# Altium PCB S56_MLD_tiny.pcbdoc (part 3 of 3)
Units mm, origin at the board's own origin, x right, y up, seen from the top; angles counter-clockwise.
Board outline 37.7 x 36.5 mm, 4 copper layers (Top Layer, Layer 1, Layer 3, Bottom Layer), stack 1.748 mm thick; 192 components, 89 nets, 791 pads, 423 vias.
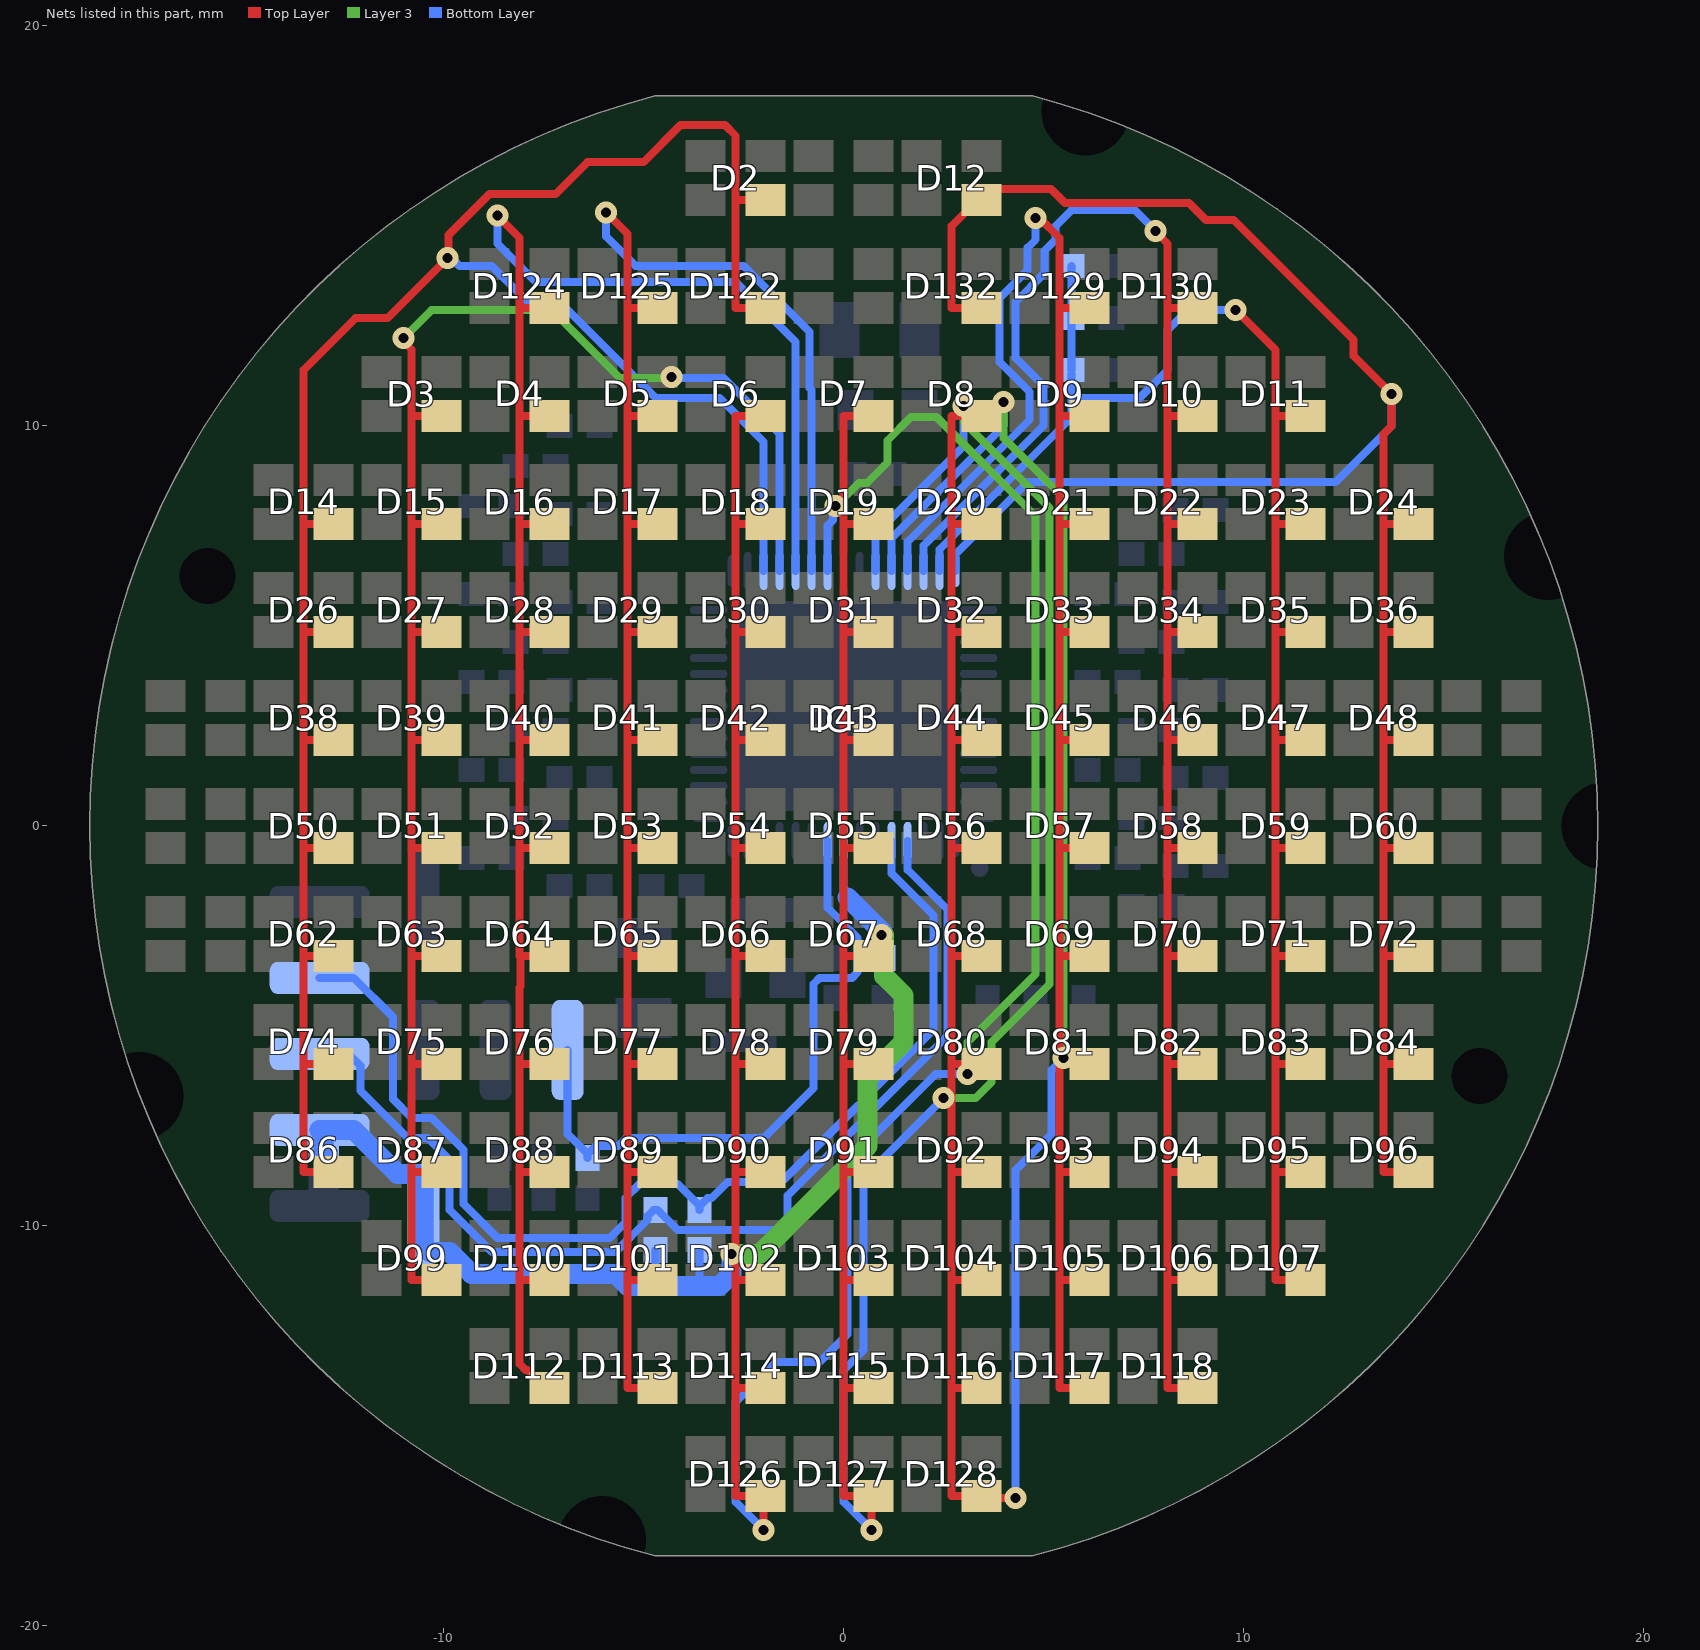
[diagram p5: the nets of this part, all layers, seen from the top]

## Via types
v1: diameter 0.55, hole 0.25, Top Layer to Layer 1, tented both sides, 200 vias
v2: diameter 0.55, hole 0.25, Top Layer to Bottom Layer, tented both sides, 178 vias
v3: diameter 0.55, hole 0.25, Layer 3 to Bottom Layer, tented both sides, 44 vias
v4: diameter 0.55/0.55/0.55/0.55 (per signal layer), hole 0.25, Top Layer to Bottom Layer, tented both sides, 1 vias

## Nets (pads, with @x,y where several pads share a name; then routed paths per layer and width w, separated by ;. In a path a pad name is that pad's centre, name@x,y a point inside that pad or via, vN(x,y) a via of type N, cw(c..) or ccw(c..) an arc to the next point about the centre after c; other vN are vias at no path point) (continued)
R2: D2.1 D14.1 D26.1 D38.1 D50.1 D62.1 D74.1 D86.1 D122.1 IC1.33 | length 57.9
  Top Layer w0.2: -13.5,-5.95 D74.1@-12.75,-5.95 ; -13.5,-3.25 D62.1@-12.75,-3.25 ; -13.5,-0.55 D50.1@-12.75,-0.55 ; -13.5,4.85 D26.1@-12.75,4.85 ; -13.5,7.55 D14.1@-12.75,7.55 ; D86.1@-12.75,-8.65 -13.5,-8.65 -13.5,2.15 ; D38.1@-12.75,2.15 -13.5,2.15 ; v2(-9.9,14.2) -11.4,12.7 -12.2,12.7 -13.5,11.4 -13.5,2.15 ; v2@-9.88,14.22 -9.88,14.775 -8.855,15.8 -7.2,15.8 -6.4,16.6 -5,16.6 -4.077,17.523 -2.97,17.523 -2.7,17.254 -2.7,16.246 -2.7,12.95 D122.1@-1.95,12.95 ; -2.7,15.65 D2.1@-1.95,15.65
  Bottom Layer w0.2: v2(-9.9,14.2) -9.808,14.2 -9.608,14 -8.8,14 -7.9,13.1 -7.1,13.1 -4.7,10.7 -3.1,10.7 -2,9.6 IC1.33@-2,6.375
R3: D3.1 D15.1 D27.1 D39.1 D51.1 D63.1 D75.1 D87.1 D99.1 IC1.34 | length 44.8
  Top Layer w0.2: v2(-11,12.2) -11,12.105 -10.8,11.905 -10.8,10.846 -10.8,-11.35 D99.1@-10.05,-11.35 ; -10.8,-8.65 D87.1@-10.05,-8.65 ; -10.8,-5.95 D75.1@-10.05,-5.95 ; -10.8,-3.25 D63.1@-10.05,-3.25 ; -10.8,-0.55 D51.1@-10.05,-0.55 ; -10.8,2.15 D39.1@-10.05,2.15 ; -10.8,4.85 D27.1@-10.05,4.85 ; -10.8,7.55 D15.1@-10.05,7.55 ; -10.8,10.25 D3.1@-10.05,10.25
  Layer 3 w0.2: v2(-11,12.2) -10.3,12.9 -7.3,12.9 -5.6,11.2 -4.325,11.2 v3(-4.3,11.225)
  Bottom Layer w0.2: v3(-4.3,11.225) -4.275,11.2 -3,11.2 -1.6,9.8 IC1.34@-1.6,6.375
R4: D4.1 D16.1 D28.1 D40.1 D52.1 D64.1 D76.1 D88.1 D100.1 D112.1 D124.1 IC1.35 | length 52.4
  Top Layer w0.2: v2(-8.656,15.256) -8.1,14.7 -8.1,13.546 -8.1,10.25 ; -8.1,-11.35 D100.1@-7.35,-11.35 ; -8.1,-8.65 D88.1@-7.35,-8.65 ; -8.1,-5.95 D76.1@-7.35,-5.95 ; -8.1,-0.55 D52.1@-7.35,-0.55 ; -8.1,2.15 D40.1@-7.35,2.15 ; -8.1,4.85 D28.1@-7.35,4.85 ; -8.1,7.55 D16.1@-7.35,7.55 ; -8.1,12.95 D124.1@-7.35,12.95 ; D112.1@-7.35,-14.05 -7.45,-14.05 -7.9,-13.6 -7.954,-13.6 -8.1,-13.454 -8.1,-4.042 -8.075,-4.017 -8.075,-3.275 -8.1,-3.25 ; D64.1@-7.35,-3.25 -8.1,-3.25 ; D4.1@-7.35,10.25 -8.1,10.25 ; -8.1,-3.25 -8.1,10.25
  Bottom Layer w0.2: v2(-8.656,15.256) -8.656,14.556 -7.7,13.6 -2.7,13.6 -1.2,12.1 IC1.35@-1.2,6.375
R5: D5.1 D17.1 D29.1 D41.1 D53.1 D65.1 D77.1 D89.1 D101.1 D113.1 D125.1 IC1.36 | length 50.5
  Top Layer w0.2: v2(-5.942,15.342) -5.4,14.8 -5.4,12.95 ; -5.4,-11.35 D101.1@-4.65,-11.35 ; -5.4,-8.65 D89.1@-4.65,-8.65 ; -5.4,-5.95 D77.1@-4.65,-5.95 ; -5.4,-3.25 D65.1@-4.65,-3.25 ; -5.4,-0.55 D53.1@-4.65,-0.55 ; -5.4,2.15 D41.1@-4.65,2.15 ; -5.4,4.85 D29.1@-4.65,4.85 ; -5.4,7.55 D17.1@-4.65,7.55 ; D113.1@-4.65,-14.05 -5.4,-14.05 -5.4,10.25 ; D5.1@-4.65,10.25 -5.4,10.25 ; D125.1@-4.65,12.95 -5.4,12.95 ; -5.4,10.25 -5.4,12.95
  Bottom Layer w0.2: v2(-5.942,15.342) -5.942,14.742 -5.2,14 -2.5,14 -0.85,12.35 -0.85,10.95 -0.8,10.9 IC1.36@-0.8,6.375
R6: D6.1 D18.1 D30.1 D42.1 D54.1 D66.1 D78.1 D90.1 D102.1 D114.1 D126.1 IC1.37 | length 75
  Top Layer w0.2: -2.7,-14.05 D114.1@-1.95,-14.05 ; -2.7,-11.35 D102.1@-1.95,-11.35 ; -2.7,-8.65 D90.1@-1.95,-8.65 ; -2.7,-5.95 D78.1@-1.95,-5.95 ; -2.7,-3.25 D66.1@-1.95,-3.25 ; -2.7,-0.55 D54.1@-1.95,-0.55 ; -2.7,2.15 D42.1@-1.95,2.15 ; -2.7,4.85 D30.1@-1.95,4.85 ; -2.7,7.55 D18.1@-1.95,7.55 ; v2(-2,-17.6) -2,-16.8 D126.1@-1.95,-16.75 -2.7,-16.75 -2.7,10.25 D6.1@-1.95,10.25
  Layer 3 w0.2: v3(-0.2,8) 0.38,8.58 0.587,8.58 1.1,9.093 1.1,9.642 1.683,10.225 2.317,10.225 4.8,7.742 4.8,-3.7 3.1,-5.4 v3(3.1,-6.2)
  Bottom Layer w0.2: v2(-2,-17.6) -2.7,-16.9 -2.7,-14.4 -1.7,-13.4 -0.6,-13.4 0.1,-12.7 0.1,-8.4 2.3,-6.2 v3(3.1,-6.2) ; IC1.37@-0.4,6.375 -0.4,7.51 -0.267,7.643 -0.267,7.933 v3(-0.2,8)
R7: D7.1 D19.1 D31.1 D43.1 D55.1 D67.1 D79.1 D91.1 D103.1 D115.1 D127.1 IC1.40 | length 73
  Top Layer w0.2: 0,-14.05 D115.1@0.75,-14.05 ; 0,-11.35 D103.1@0.75,-11.35 ; 0,-8.65 D91.1@0.75,-8.65 ; 0,-5.95 D79.1@0.75,-5.95 ; 0,-3.25 D67.1@0.75,-3.25 ; 0,-0.55 D55.1@0.75,-0.55 ; 0,2.15 D43.1@0.75,2.15 ; 0,4.85 D31.1@0.75,4.85 ; 0,7.55 D19.1@0.75,7.55 ; v2(0.7,-17.6) 0.7,-16.8 D127.1@0.75,-16.75 0,-16.75 0,10.25 D7.1@0.75,10.25
  Layer 3 w0.2: v3(2.5,-6.8) 3.3,-6.8 3.7,-6.4 3.7,-5.4 5.15,-3.95 5.15,7.95 3.007,10.093 3.007,10.493 v3(3,10.5)
  Bottom Layer w0.2: v2(0.7,-17.6) 0,-16.9 0,-13.6 0.5,-13.1 0.5,-8.8 v3(2.5,-6.8) ; IC1.40@0.8,6.375 0.8,7.296 3,9.496 v3(3,10.5)
R8: D8.1 D20.1 D32.1 D44.1 D56.1 D68.1 D80.1 D92.1 D104.1 D116.1 D128.1 IC1.41 | length 70
  Top Layer w0.2: 2.7,-14.05 D116.1@3.45,-14.05 ; 2.7,-11.35 D104.1@3.45,-11.35 ; 2.7,-8.65 D92.1@3.45,-8.65 ; 2.7,-5.95 D80.1@3.45,-5.95 ; 2.7,-3.25 D68.1@3.45,-3.25 ; 2.7,-0.55 D56.1@3.45,-0.55 ; 2.7,2.15 D44.1@3.45,2.15 ; 2.7,4.85 D32.1@3.45,4.85 ; 2.7,7.55 D20.1@3.45,7.55 ; D8.1@3.45,10.25 2.7,10.25 2.7,-16.75 D128.1@3.45,-16.75 3.5,-16.8 v2(4.3,-16.8)
  Layer 3 w0.2: v3(4,10.6) 4,9.7 5.5,8.2 v3(5.5,-5.8)
  Bottom Layer w0.2: IC1.41@1.2,6.375 1.2,7.201 4,10.001 v3(4,10.6) ; v2(4.3,-16.8) 4.3,-8.6 5.2,-7.7 5.2,-6.1 v3(5.5,-5.8)
R9: D9.1 D21.1 D33.1 D45.1 D57.1 D69.1 D81.1 D93.1 D105.1 D117.1 D129.1 IC1.42 | length 48.6
  Top Layer w0.2: v2(4.8,15.2) 4.895,15.2 5.4,14.695 5.4,12.95 ; 5.4,-11.35 D105.1@6.15,-11.35 ; 5.4,-8.65 D93.1@6.15,-8.65 ; 5.4,-5.95 D81.1@6.15,-5.95 ; 5.4,-3.25 D69.1@6.15,-3.25 ; 5.4,-0.55 D57.1@6.15,-0.55 ; 5.4,2.15 D45.1@6.15,2.15 ; 5.4,4.85 D33.1@6.15,4.85 ; 5.4,7.55 D21.1@6.15,7.55 ; D117.1@6.15,-14.05 5.4,-14.05 5.4,10.25 ; D9.1@6.15,10.25 5.4,10.25 ; D129.1@6.15,12.95 5.4,12.95 ; 5.4,10.25 5.4,12.95
  Bottom Layer w0.2: IC1.42@1.6,6.375 1.6,7.107 4.65,10.157 4.65,10.85 3.9,11.6 3.9,13.2 4.6,13.9 4.6,14.458 4.8,14.658 v2(4.8,15.2)
R10: D10.1 D22.1 D34.1 D46.1 D58.1 D70.1 D82.1 D94.1 D106.1 D118.1 D130.1 IC1.43 | length 50.8
  Top Layer w0.2: v2(7.8,14.875) 7.8,14.854 8.1,14.554 8.1,13.546 8.1,7.55 ; 8.1,-11.35 D106.1@8.85,-11.35 ; 8.1,-8.65 D94.1@8.85,-8.65 ; 8.1,-5.95 D82.1@8.85,-5.95 ; 8.1,-3.25 D70.1@8.85,-3.25 ; 8.1,-0.55 D58.1@8.85,-0.55 ; 8.1,2.15 D46.1@8.85,2.15 ; 8.1,4.85 D34.1@8.85,4.85 ; 8.1,10.25 D10.1@8.85,10.25 ; 8.1,12.95 D130.1@8.85,12.95 ; D118.1@8.85,-14.05 8.1,-14.05 8.1,7.55 ; D22.1@8.85,7.55 8.1,7.55
  Bottom Layer w0.2: IC1.43@2,6.375 2,7.012 5,10.012 5,11 4.3,11.7 4.3,13.105 5.016,13.821 5.016,14.379 5.3,14.663 5.3,15 5.7,15.4 7.275,15.4 v2(7.8,14.875)
R11: D11.1 D23.1 D35.1 D47.1 D59.1 D71.1 D83.1 D85.A D95.1 D97.A D98.A D107.1 IC1.44 | length 45.9
  Top Layer w0.2: v2(9.8,12.9) 10.8,11.9 10.8,10.846 10.8,7.55 ; 10.8,-8.65 D95.1@11.55,-8.65 ; 10.8,-5.95 D83.1@11.55,-5.95 ; 10.8,-3.25 D71.1@11.55,-3.25 ; 10.8,-0.55 D59.1@11.55,-0.55 ; 10.8,2.15 D47.1@11.55,2.15 ; 10.8,4.85 D35.1@11.55,4.85 ; 10.8,10.25 D11.1@11.55,10.25 ; D107.1@11.55,-11.35 10.8,-11.35 10.8,7.55 ; D23.1@11.55,7.55 10.8,7.55
  Bottom Layer w0.2: IC1.44@2.4,6.375 2.4,6.917 5.7,10.217 5.7,10.697 ; D85.A@5.7,11.3 5.7,10.697 ; D85.A@5.7,11.4 D97.A@5.7,12.7 D98.A@5.7,14 ; v2(9.8,12.9) 8.6,12.9 8.1,12.4 8.1,11.4 7.397,10.697 5.7,10.697
R12: D12.1 D24.1 D36.1 D48.1 D60.1 D72.1 D84.1 D96.1 D132.1 IC1.45 | length 54.8
  Top Layer w0.2: D132.1@3.45,12.95 2.7,12.95 2.7,13.546 2.7,15 3.35,15.65 D12.1@3.45,15.65 3.725,15.925 5.18,15.925 5.532,15.573 8.632,15.573 9.055,15.15 9.75,15.15 12.75,12.15 12.75,11.75 v2(13.7,10.8) 13.7,10 13.5,9.8 13.5,7.55 ; 13.5,-5.95 D84.1@14.25,-5.95 ; 13.5,-3.25 D72.1@14.25,-3.25 ; 13.5,-0.55 D60.1@14.25,-0.55 ; 13.5,2.15 D48.1@14.25,2.15 ; 13.5,4.85 D36.1@14.25,4.85 ; D96.1@14.25,-8.65 13.5,-8.65 13.5,7.55 ; D24.1@14.25,7.55 13.5,7.55
  Bottom Layer w0.2: IC1.45@2.8,6.375 2.8,6.8 4.6,8.6 12.3,8.6 13.7,10 v2(13.7,10.8)
SCL: IC1.5 R1.1 X4.1 | length 28.3
  Bottom Layer w0.2: X4.1@-13.1,-3.8 -12.25,-3.8 -11.272,-4.778 -11.272,-6.828 -10.8,-7.3 -10.3,-7.3 -9.5,-8.1 -9.5,-9.454 -8.654,-10.3 -5.851,-10.3 -5.45,-9.899 -5.45,-9.296 -5.104,-8.95 -4.15,-8.95 R1.1@-3.6,-9.5 ; R1.1@-3.6,-9.6 R1.1@-3.6,-9.5 ; IC1.5@1.2,-0.375 1.2,-1.192 2.25,-2.242 2.25,-5.093 -1.507,-8.85 -1.545,-8.85 -1.595,-8.9 -2.9,-8.9 -3.3,-9.3 -3.4,-9.3 R1.1@-3.6,-9.5
SDA: IC1.4 R2.1 X3.1 | length 27.2
  Bottom Layer w0.2: X3.1@-13.1,-5.7 -12.374,-5.7 -12.081,-5.992 -12.081,-6.619 -10.9,-7.8 -10.4,-7.8 -9.85,-8.35 -9.85,-9.599 -8.799,-10.65 -5.707,-10.65 -4.9,-9.843 -4.9,-9.75 -4.75,-9.6 R2.1@-4.65,-9.6 ; R2.1@-4.7,-9.6 R2.1@-4.65,-9.6 ; IC1.4@1.6,-0.375 1.6,-1.097 2.6,-2.097 2.6,-5.238 -1.4,-9.238 -1.4,-9.8 -1.7,-10.1 -4.15,-10.1 R2.1@-4.65,-9.6
SHDN: IC1.9 R3.2 X7.1 | length 16.7
  Bottom Layer w0.2: X7.1@-6.9,-5.6 -6.9,-7.7 R3.2@-6.4,-8.2 ; R3.2@-6.4,-8.3 R3.2@-6.4,-8.2 ; IC1.9@-0.4,-0.375 -0.4,-2.046 0.35,-2.796 0.35,-3.654 0.204,-3.8 -0.604,-3.8 -0.75,-3.946 -0.75,-6.55 -2,-7.8 -5.438,-7.8 -5.638,-8 -6.2,-8 R3.2@-6.4,-8.2
VIO: C1.1 IC1.8 J4.2 R1.2 R2.2 X2.1 X6.1 | length 29.5
  Layer 3 w0.5: v3(-2.8,-10.7) -2.1,-10.7 0.6,-8 0.6,-6.3 1.5,-5.4 1.5,-4.238 1.01,-3.748 1.01,-2.734 v3@1,-2.724
  Bottom Layer w0.2: -4.7,-11.5 R2.2@-4.7,-10.6 ; -3.6,-11.5 R1.2@-3.6,-10.6 ; IC1.8@0,-0.375 0,-1.689 0.1,-1.789
  Bottom Layer w0.5: J4.2@-13,-8.087 -13,-7.7 X2.1@-13.1,-7.6 -12.25,-7.6 -11.15,-8.7 -10.65,-8.7 -10.5,-8.85 X6.1@-10.5,-9.7 -10.5,-10.497 -10.35,-10.647 -9.853,-10.647 -9.3,-11.2 -5.7,-11.2 -5.4,-11.5 -4.7,-11.5 -3.6,-11.5 -3.1,-11.5 -2.81,-11.21 -2.81,-10.71 v3(-2.8,-10.7) ; 0.1,-1.789 1,-2.689 v3@1,-2.7 ; C1.1@1,-3.3 v3@1,-2.701
  other v3: 0.95,-2.724
pads on no net: Bo9.1 IC1.

## Polygon pours and split planes (outlines as drawn)
GND on Layer 3 "GND_L03_P001" (solid, remove dead copper, pour order 1): -21.8,20.7 -21.8,-21.3 22.4,-21.3 22.4,20.7
AVCC on Layer 3 "AVCC_L03_P000" (solid, pour order 0): -2.5,-3.1 -2.1,-2.7 -2.1,-1.1 -2.5,-0.7 -2.5,7.4 -0.6,9.3 0.3,9.3 0.5,9.5 0.5,10 0.1,10.4 -2.2,10.4 -4.9,7.7 -4.9,-1.2 -3,-3.1

## Keep-outs
Keep-Out Layer:
  the board outline again, w0.1

## Other copper
Layer 3:
  rectangle net GND: -2,1 2,5
Bottom Layer:
  rectangle: -3.5,-5.95 -2.65,-5.85
  region: -1.5,-5.85 -2.35,-5.85 -2.35,-5.95 -1.5,-5.95
  region net AVCC: 0.307,7.657 0.307,8.175 0.55,8.175 0.55,7.657 0.478,7.657 0.478,6.878 0.4,6.8 -0.1,6.8 -0.1,7.25
  text "RIN260617" at 2,17.592 h0.8 r180
  text "S56 MLD Tiny Prototype" at -5.311,16.611 h1 r180
  text "R" at 7.7,14.2 h0.8 r180
  text "GND" at -11.15,0.208 h0.8 r90
  text "GND" at -16.664,-1.65 h0.8 r180
  text "SCK" at -16.692,-2.95 h0.8 r180
  text "SCL" at -16.598,-3.65 h0.8 r180
  text "MOSI" at -16.878,-4.75 h0.8 r180
  text "MISO" at -7.55,-4.9 h0.8 r90
  text "CS" at -9.35,-5.23 h0.8 r90
  text "SDA" at -16.677,-5.45 h0.8 r180
  text "SHDN" at -5.75,-5.522 h0.8 r90
  text "SPI  I2C" at -3.541,-6.05 h0.8 r180
  text "VIO" at -16.482,-7.35 h0.8 r180
  text "2.7V ... 5.5V" at -14.569,-10.153 h0.8 r180
  text "VCC" at -13.59,-10.809 h0.8 r180
  text "VIO" at -10.65,-11.218 h0.8 r90
  text "IS31FL3761" at -8.458,-12.912 h1 r180

## Silkscreen, mask and mechanical layers (free items; w line width, h text height)
Top Overlay:
  rectangle: -41,92 -39,94
  rectangle: -38.5,92.004 -36.5,94.004
  rectangle: -36,92 -34,94
  rectangle: -28.5,92 -26.5,94
  rectangle: -31,92.004 -29,94.004
  rectangle: -33.5,92 -31.5,94
  rectangle: -43.5,92.004 -41.5,94.004
  rectangle: -46,92.007 -44,94.007
  rectangle: -48.5,92.004 -46.5,94.004
  rectangle: -51,92 -49,94
  rectangle: -53.5,92.004 -51.5,94.004
  rectangle: -56,92 -54,94
  rectangle: -26,92 -24,94
  rectangle: -26,94.5 -24,96.5
  rectangle: -56,94.5 -54,96.5
  rectangle: -53.5,94.504 -51.5,96.504
  rectangle: -51,94.5 -49,96.5
  rectangle: -48.5,94.504 -46.5,96.504
  rectangle: -46,94.507 -44,96.507
  rectangle: -43.5,94.504 -41.5,96.504
  rectangle: -33.5,94.5 -31.5,96.5
  rectangle: -31,94.504 -29,96.504
  rectangle: -28.5,94.5 -26.5,96.5
  rectangle: -36,94.5 -34,96.5
  rectangle: -38.5,94.504 -36.5,96.504
  rectangle: -41,94.5 -39,96.5
  rectangle: -53.5,97.004 -51.5,99.004
  rectangle: -51,97 -49,99
  rectangle: -48.5,97.004 -46.5,99.004
  rectangle: -46,97.007 -44,99.007
  rectangle: -43.5,97.004 -41.5,99.004
  rectangle: -33.5,97 -31.5,99
  rectangle: -31,97.004 -29,99.004
  rectangle: -28.5,97 -26.5,99
  rectangle: -36,97 -34,99
  rectangle: -38.5,97.004 -36.5,99.004
  rectangle: -41,97 -39,99
  rectangle: -53.5,99.504 -51.5,101.504
  rectangle: -51,99.5 -49,101.5
  rectangle: -48.5,99.504 -46.5,101.504
  rectangle: -46,99.507 -44,101.507
  rectangle: -43.5,99.504 -41.5,101.504
  rectangle: -33.5,99.5 -31.5,101.5
  rectangle: -31,99.504 -29,101.504
  rectangle: -28.5,99.5 -26.5,101.5
  rectangle: -36,99.5 -34,101.5
  rectangle: -38.5,99.504 -36.5,101.504
  rectangle: -41,99.5 -39,101.5
  rectangle: -51,102 -49,104
  rectangle: -48.5,102.004 -46.5,104.004
  rectangle: -46,102.007 -44,104.007
  rectangle: -43.5,102.004 -41.5,104.004
  rectangle: -33.5,102 -31.5,104
  rectangle: -31,102.004 -29,104.004
  rectangle: -36,102 -34,104
  rectangle: -38.5,102.004 -36.5,104.004
  rectangle: -41,102 -39,104
  rectangle: -48.5,104.504 -46.5,106.504
  rectangle: -46,104.507 -44,106.507
  rectangle: -43.5,104.504 -41.5,106.504
  rectangle: -33.5,104.5 -31.5,106.5
  rectangle: -36,104.5 -34,106.5
  rectangle: -38.5,104.504 -36.5,106.504
  rectangle: -41,104.5 -39,106.5
  rectangle: -43.5,107.004 -41.5,109.004
  rectangle: -38.5,107.004 -36.5,109.004
  rectangle: -41,107 -39,109
  rectangle: -26,89.5 -24,91.5
  rectangle: -56,89.5 -54,91.5
  rectangle: -53.5,89.504 -51.5,91.504
  rectangle: -51,89.5 -49,91.5
  rectangle: -48.5,89.504 -46.5,91.504
  rectangle: -46,89.507 -44,91.507
  rectangle: -43.5,89.504 -41.5,91.504
  rectangle: -33.5,89.5 -31.5,91.5
  rectangle: -31,89.504 -29,91.504
  rectangle: -28.5,89.5 -26.5,91.5
  rectangle: -36,89.5 -34,91.5
  rectangle: -38.5,89.504 -36.5,91.504
  rectangle: -41,89.5 -39,91.5
  rectangle: -53.5,87.004 -51.5,89.004
  rectangle: -51,87 -49,89
  rectangle: -48.5,87.004 -46.5,89.004
  rectangle: -46,87.007 -44,89.007
  rectangle: -43.5,87.004 -41.5,89.004
  rectangle: -33.5,87 -31.5,89
  rectangle: -31,87.004 -29,89.004
  rectangle: -28.5,87 -26.5,89
  rectangle: -36,87 -34,89
  rectangle: -38.5,87.004 -36.5,89.004
  rectangle: -41,87 -39,89
  rectangle: -53.5,84.504 -51.5,86.504
  rectangle: -51,84.5 -49,86.5
  rectangle: -48.5,84.504 -46.5,86.504
  rectangle: -46,84.507 -44,86.507
  rectangle: -43.5,84.504 -41.5,86.504
  rectangle: -33.5,84.5 -31.5,86.5
  rectangle: -31,84.504 -29,86.504
  rectangle: -28.5,84.5 -26.5,86.5
  rectangle: -36,84.5 -34,86.5
  rectangle: -38.5,84.504 -36.5,86.504
  rectangle: -41,84.5 -39,86.5
  rectangle: -51,82 -49,84
  rectangle: -48.5,82.004 -46.5,84.004
  rectangle: -46,82.007 -44,84.007
  rectangle: -43.5,82.004 -41.5,84.004
  rectangle: -33.5,82 -31.5,84
  rectangle: -31,82.004 -29,84.004
  rectangle: -36,82 -34,84
  rectangle: -38.5,82.004 -36.5,84.004
  rectangle: -41,82 -39,84
  rectangle: -48.5,79.504 -46.5,81.504
  rectangle: -46,79.507 -44,81.507
  rectangle: -43.5,79.504 -41.5,81.504
  rectangle: -33.5,79.5 -31.5,81.5
  rectangle: -36,79.5 -34,81.5
  rectangle: -38.5,79.504 -36.5,81.504
  rectangle: -41,79.5 -39,81.5
  rectangle: -43.5,77.004 -41.5,79.004
  rectangle: -38.5,77.004 -36.5,79.004
  rectangle: -41,77 -39,79
Bottom Solder:
  region: -1.5,-5.85 -2.35,-5.85 -2.35,-5.95 -1.5,-5.95
  rectangle: -3.5,-5.95 -2.65,-5.85
  text "RIN260617" at 2,17.592 h0.8 r180
  text "S56 MLD Tiny Prototype" at -5.311,16.611 h1 r180
  text "GND" at -11.15,0.208 h0.8 r90
  text "GND" at -16.664,-1.65 h0.8 r180
  text "SCK" at -16.692,-2.95 h0.8 r180
  text "SCL" at -16.598,-3.65 h0.8 r180
  text "MOSI" at -16.878,-4.75 h0.8 r180
  text "MISO" at -7.55,-4.9 h0.8 r90
  text "CS" at -9.35,-5.23 h0.8 r90
  text "SDA" at -16.677,-5.45 h0.8 r180
  text "SHDN" at -5.75,-5.522 h0.8 r90
  text "SPI  I2C" at -3.541,-6.05 h0.8 r180
  text "VIO" at -16.482,-7.35 h0.8 r180
  text "2.7V ... 5.5V" at -14.569,-10.153 h0.8 r180
  text "VCC" at -13.59,-10.809 h0.8 r180
  text "VIO" at -10.65,-11.218 h0.8 r90
  text "IS31FL3761" at -8.458,-12.912 h1 r180
Mechanische Umrandung:
  rectangle: -7.5,104.5 -6.5,105.5
  rectangle: -9.5,104.5 -8.5,105.5
  rectangle: -11.5,104.5 -10.5,105.5
  rectangle: -3.5,102.5 -2.5,103.5
  rectangle: -5.5,102.5 -4.5,103.5
  rectangle: -7.5,102.5 -6.5,103.5
  rectangle: -9.5,102.5 -8.5,103.5
  rectangle: -11.5,102.5 -10.5,103.5
  rectangle: -13.5,102.5 -12.5,103.5
  rectangle: -15.5,102.5 -14.5,103.5
  rectangle: -1.5,100.5 -0.5,101.5
  rectangle: -3.5,100.5 -2.5,101.5
  rectangle: -5.5,100.5 -4.5,101.5
  rectangle: -7.5,100.5 -6.5,101.5
  rectangle: -9.5,100.5 -8.5,101.5
  rectangle: -11.5,100.5 -10.5,101.5
  rectangle: -13.5,100.5 -12.5,101.5
  rectangle: -15.5,100.5 -14.5,101.5
  rectangle: -17.5,100.5 -16.5,101.5
  rectangle: 0.5,98.5 1.5,99.5
  rectangle: -1.5,98.5 -0.5,99.5
  rectangle: -3.5,98.5 -2.5,99.5
  rectangle: -5.5,98.5 -4.5,99.5
  rectangle: -7.5,98.5 -6.5,99.5
  rectangle: -9.5,98.5 -8.5,99.5
  rectangle: -11.5,98.5 -10.5,99.5
  rectangle: -13.5,98.5 -12.5,99.5
  rectangle: -15.5,98.5 -14.5,99.5
  rectangle: -17.5,98.5 -16.5,99.5
  rectangle: -19.5,98.5 -18.5,99.5
  rectangle: 0.5,96.5 1.5,97.5
  rectangle: -1.5,96.5 -0.5,97.5
  rectangle: -3.5,96.5 -2.5,97.5
  rectangle: -5.5,96.5 -4.5,97.5
  rectangle: -7.5,96.5 -6.5,97.5
  rectangle: -9.5,96.5 -8.5,97.5
  rectangle: -11.5,96.5 -10.5,97.5
  rectangle: -13.5,96.5 -12.5,97.5
  rectangle: -15.5,96.5 -14.5,97.5
  rectangle: -17.5,96.5 -16.5,97.5
  rectangle: -19.5,96.5 -18.5,97.5
  rectangle: 2.5,94.5 3.5,95.5
  rectangle: 0.5,94.5 1.5,95.5
  rectangle: -1.5,94.5 -0.5,95.5
  rectangle: -3.5,94.5 -2.5,95.5
  rectangle: -5.5,94.5 -4.5,95.5
  rectangle: -7.5,94.5 -6.5,95.5
  rectangle: -9.5,94.5 -8.5,95.5
  rectangle: -11.5,94.5 -10.5,95.5
  rectangle: -13.5,94.5 -12.5,95.5
  rectangle: -15.5,94.5 -14.5,95.5
  rectangle: -17.5,94.5 -16.5,95.5
  rectangle: -19.5,94.5 -18.5,95.5
  rectangle: -21.5,94.5 -20.5,95.5
  rectangle: 2.5,92.5 3.5,93.5
  rectangle: 0.5,92.5 1.5,93.5
  rectangle: -1.5,92.5 -0.5,93.5
  rectangle: -3.5,92.5 -2.5,93.5
  rectangle: -5.5,92.5 -4.5,93.5
  rectangle: -7.5,92.5 -6.5,93.5
  rectangle: -9.5,92.5 -8.5,93.5
  rectangle: -11.5,92.5 -10.5,93.5
  rectangle: -13.5,92.5 -12.5,93.5
  rectangle: -15.5,92.5 -14.5,93.5
  rectangle: -17.5,92.5 -16.5,93.5
  rectangle: -19.5,92.5 -18.5,93.5
  rectangle: -21.5,92.5 -20.5,93.5
  rectangle: 2.5,90.5 3.5,91.5
  rectangle: 0.5,90.5 1.5,91.5
  rectangle: -1.5,90.5 -0.5,91.5
  rectangle: -3.5,90.5 -2.5,91.5
  rectangle: -5.5,90.5 -4.5,91.5
  rectangle: -7.5,90.5 -6.5,91.5
  rectangle: -9.5,90.5 -8.5,91.5
  rectangle: -11.5,90.5 -10.5,91.5
  rectangle: -13.5,90.5 -12.5,91.5
  rectangle: -15.5,90.5 -14.5,91.5
  rectangle: -17.5,90.5 -16.5,91.5
  rectangle: -19.5,90.5 -18.5,91.5
  rectangle: -21.5,90.5 -20.5,91.5
  rectangle: 0.5,88.5 1.5,89.5
  rectangle: -1.5,88.5 -0.5,89.5
  rectangle: -3.5,88.5 -2.5,89.5
  rectangle: -5.5,88.5 -4.5,89.5
  rectangle: -7.5,88.5 -6.5,89.5
  rectangle: -9.5,88.5 -8.5,89.5
  rectangle: -11.5,88.5 -10.5,89.5
  rectangle: -13.5,88.5 -12.5,89.5
  rectangle: -15.5,88.5 -14.5,89.5
  rectangle: -17.5,88.5 -16.5,89.5
  rectangle: -19.5,88.5 -18.5,89.5
  rectangle: 0.5,86.5 1.5,87.5
  rectangle: -1.5,86.5 -0.5,87.5
  rectangle: -3.5,86.5 -2.5,87.5
  rectangle: -5.5,86.5 -4.5,87.5
  rectangle: -7.5,86.5 -6.5,87.5
  rectangle: -9.5,86.5 -8.5,87.5
  rectangle: -11.5,86.5 -10.5,87.5
  rectangle: -13.5,86.5 -12.5,87.5
  rectangle: -15.5,86.5 -14.5,87.5
  rectangle: -17.5,86.5 -16.5,87.5
  rectangle: -19.5,86.5 -18.5,87.5
  rectangle: -1.5,84.5 -0.5,85.5
  rectangle: -3.5,84.5 -2.5,85.5
  rectangle: -5.5,84.5 -4.5,85.5
  rectangle: -7.5,84.5 -6.5,85.5
  rectangle: -9.5,84.5 -8.5,85.5
  rectangle: -11.5,84.5 -10.5,85.5
  rectangle: -13.5,84.5 -12.5,85.5
  rectangle: -15.5,84.5 -14.5,85.5
  rectangle: -17.5,84.5 -16.5,85.5
  rectangle: -3.5,82.5 -2.5,83.5
  rectangle: -5.5,82.5 -4.5,83.5
  rectangle: -7.5,82.5 -6.5,83.5
  rectangle: -9.5,82.5 -8.5,83.5
  rectangle: -11.5,82.5 -10.5,83.5
  rectangle: -13.5,82.5 -12.5,83.5
  rectangle: -15.5,82.5 -14.5,83.5
  rectangle: -7.5,80.5 -6.5,81.5
  rectangle: -9.5,80.5 -8.5,81.5
  rectangle: -11.5,80.5 -10.5,81.5
  lines w0.1: -18.85,-18.25 18.85,-18.25 ; -18.85,18.25 18.85,18.25 ; -4.718,-18.25 cw(c0,0) -4.718,18.25 ; 4.718,-18.25 ccw(c0,0) 4.718,18.25
Route Tool Path:
  lines w2: -4.968,-19.218 cw(c0,0) -4.968,19.218 ; 4.968,-19.218 ccw(c0,0) 4.968,19.218
Rahmen Bottom:
  region: 78.16,-69.846 75.215,-69.846 75.215,-72.791 78.16,-72.791
  lines w0.1: -49.765,46 -49.765,49.534 ; -17.265,46 -17.265,49.534 ; 15.235,46 15.235,49.534 ; 47.735,46 47.735,49.534 ; 80.235,46 80.235,49.534
  lines w0.18: -71.815,-48.75 -67.765,-48.75 ; -71.815,-16.5 -67.765,-16.5 ; -71.815,16 -67.765,16 ; 112,-48.75 115.56,-48.75 ; 112,-16.5 115.56,-16.5 ; 112,16 115.56,16
  lines w0.21: 46.17,-75.571 66.285,-75.565 ; 46.17,-70.296 66.285,-70.295
  lines w0.36: -67.765,-70.246 46.17,-70.246 ; -67.765,-67.396 112,-67.396 112,-78.25 ; -60.55,-78.25 -60.55,-70.246 ; -53.515,-78.298 -53.515,-70.294 ; -46.465,-78.273 -46.465,-70.269 ; -37.37,-70.246 -37.37,-67.396 ; -27.765,-78.25 -27.765,-70.246 ; -14.05,-78.25 -14.05,-67.396 ; -14.05,-75.546 46.17,-75.546 ; 46.17,-78.25 46.17,-67.646 ; 46.17,-72.83 73.14,-72.83 ; 66.285,-78.25 66.285,-67.396 ; 73.14,-78.25 73.14,-67.396 ; 73.14,-74.595 111.746,-74.595 ; 112,-78.25 112,46 -67.765,46 -67.765,-78.25 112,-78.25
  text "1" at 98.204,47.029 h1.3
  text "6" at -64.965,47.009 h1.3
  text "5" at -31.915,47.009 h1.3
  text "4" at 0.985,47.009 h1.3
  text "3" at 32.285,47.009 h1.3
  text "2" at 64.81,47.009 h1.3
  text "A" at -69.34,31.244 h1.3
  text "A" at 115.61,31.125 h1.3
  text "B" at 115.61,-0.9 h1.3
  text "B" at -69.34,-1.106 h1.3
  text "C" at -69.34,-32.581 h1.3
  text "C" at 115.61,-32.575 h1.3
  text "Artikel-Nr." at -31.66,-66.571 h2.15
  text "D" at -69.34,-68.656 h1.3
  text "D" at 115.51,-68.75 h1.3
  text "Scale" at 70.985,-68.796 h1.1
  text "Plot-date / Plotdatum" at -15.25,-69 h1.1
  text "06.07.2009" at -29.72,-69.071 h1.1
  text "Device / Type // Gerät / Typ" at 44.96,-69.196 h1.1
  text "Modified on: / Geändert am:" at 65.265,-69.22 h1.1
  text ".A9_GeraeteTyp" at 31.25,-69.25 h1.1
  text "AE-Nr." at -38.77,-69.296 h1.1
  text "Massstab" at 71.735,-69.796 h1.1
  text "EAO AG" at 110.16,-70.496 h1.1
  text "Approvel state" at -16.515,-71.796 h1.1
  text "Description" at 44.985,-71.796 h1.1
  text ".A10_Massstab" at 71.485,-71.796 h1.8
  text "Modified by / Geändert von:" at 65.265,-71.951 h1.1
  text "Version" at -47.93,-72.394 h1.1
  text "Item No. / Zeichnungs-Nr." at -29.72,-72.371 h1.1
  text "Sheet-No." at -62.11,-72.496 h1.1
  text "Edition" at -55.28,-72.494 h1.1
  text "CH-4601 Olten" at 110.16,-72.496 h1.1
  text "eao" at 88.23,-72.647 h5.78
  text "Freigabestatus" at -16.515,-73.046 h1.1
  text "Benennung (PPS)" at 44.985,-73.046 h1.1
  text "Draw on: / Erstellt am:" at 65.265,-74.64 h1.1
  text "Format" at 71.285,-74.671 h1.1
  text "/" at -63.765,-76.046 h2.35
  text "Replacement for" at 91.235,-76.046 h1.1
  text "Replaced with" at 110.235,-76.046 h1.1
  text "A4" at 70.935,-76.921 h1.8
  text "Charakteristic / Merkmale" at 44.96,-77.296 h1.1
  text "Draw by: / Erstellt von:" at 65.21,-77.321 h1.1
  text "Ersatz für" at 91.235,-77.546 h1.1
  text "Ersetzt durch" at 110.235,-77.546 h1.1
  text "Streng vertraulich. Alle Rechte ausdrücklich vorbehalten. Die Vervielfältigung und insbesondere die Verarbeitung in elektronischen Systemen ist ohne schriftliche Genehmigung der EAO AG nicht gestattet." at 85.485,-79.75 h1.5
  text "© EAO AG" at 93.235,-79.75 h1.5
  text "Strictly confidential. All rights stricly reserved. Reproduction and processing of data in electronical systems or in any form whatever is not permitted without written authority of EAO AG" at 85.485,-81.25 h1.5
Schrift Bottom:
  text ".B14_ArtikelNr" at -43.75,-66.5 h2.15
  text ".B5_GeaendertAm" at 52.083,-69.201 h1.1
  text ".B8_AenderungsNr" at -43.75,-69.25 h1.1
  text ".B6_GeaendertVon" at 51.995,-72.004 h1.1
  text ".B2e_Description" at 31.25,-72.5 h2.35
  text ".B3_ErstelltAm" at 52.095,-74.693 h1.1
  text ".B2_Benennung" at 31.25,-74.75 h2.35
  text ".A17_Freigabestatus" at -15,-75.975 h1.5
  text ".B16_vonSeite" at -65.25,-76 h2.35
  text ".B15b_Seite" at -62,-76 h2.35
  text ".B7_Version" at -48.5,-76 h2.35
  text ".B1_ZeichnungsNr" at -30.25,-76 h2.35
  text ".B13_ErsatzFuer" at 83.335,-77.242 h1.1
  text ".B11_Merkmale" at 31.25,-77.25 h1.1
  text ".A12_ErsatzDurch" at 102,-77.25 h1.1
  text ".B4_ErstelltVon" at 51.975,-77.375 h1.1
Zeichnung, Schrift Nutzen:
  text ".A14_ArtikelNr" at 87.25,-66.546 h2.15
  text ".A5_GeaendertAm" at -7.75,-69.25 h1.1
  text ".A8_AenderungsNr" at 94.527,-69.28 h1.1
  text ".A6_GeaendertVon" at -7.75,-72 h1.1
  text ".A2e_Description" at 13.5,-72.5 h2.35
  text ".A3_ErstelltAm" at -7.75,-74.75 h1.1
  text ".A2_Benennung" at 13.5,-74.75 h2.35
  text ".A17_Freigabestatus" at 59.5,-76 h1.5
  text ".A7_Version" at 93,-76 h2.35
  text ".A15b_Seite" at 106.25,-76 h2.35
  text ".A16_vonSeite" at 109.5,-76 h2.35
  text ".A1_ZeichnungsNr" at 74,-76.296 h2.35
  text ".A12_ErsatzDurch" at -58.75,-77.25 h1.1
  text ".A13_ErsatzFuer" at -39,-77.25 h1.1
  text ".A4_ErstelltVon" at -7.75,-77.25 h1.1
  text ".A11_Merkmale" at 13.5,-77.25 h1.1
Schrift Bohrplan:
  circle w0.254: c94.999,-57.015 r2
  lines w0.2: -65.6,-38.49 -58,-38.49 ; -40.35,-38.49 -31.75,-38.49 ; -26.85,-38.49 -5,-38.49 ; 8.4,-38.49 26.75,-38.49 ; 51.4,-38.49 69.25,-38.49 ; 75.65,-38.49 86.5,-38.49 ; 93.599,-55.615 96.349,-58.365
  text "THICKNESS" at -40.25,-36.49 h1.7
  text "SURFACE TREATMENT /" at -26.75,-36.49 h1.7
  text "MANUFACTURING DATA" at 51.5,-36.49 h1.7
  text "REQUIREMENT" at 75.5,-36.49 h1.7
  text "MATERIAL" at -65.5,-37.99 h1.7
  text "DICKE" at -40.25,-37.99 h1.7
  text "OBERFLÄCHENBEHANDLUNG" at -26.75,-37.99 h1.7
  text "MECHANICS / MECHANIK" at 8.5,-37.99 h1.7
  text "FABRIKATIONSDATEN" at 51.5,-37.99 h1.7
  text "VORSCHRIFT" at 75.75,-37.99 h1.7
  text "Technical terms of delivery for" at 75.75,-41.24 h1.7
  text "[ x ] Glasepoxy FR4" at -65.5,-41.49 h1.7
  text "[    ] 0.6mm" at -40.25,-41.49 h1.7
  text "[ x ] Chemically / Chemisch Gold (ENIG)" at -26.75,-41.49 h1.7
  text "[ x ] Array as shown on drawing-no.                  Sheet 2/2" at 8.25,-41.49 h1.7
  text "[ x ] Files sent by e-mail" at 51.5,-41.49 h1.7
  text "PCBs from EAO AG, P40531013" at 75.75,-43.24 h1.7
  text "[    ] Papierepoxy FR3" at -65.5,-43.49 h1.7
  text "[    ] 0.8mm" at -40.25,-43.49 h1.7
  text "[    ] Hot air levelling / Heissluftverzinnt (HAL) Sn" at -26.75,-43.49 h1.7
  text "Daten via E-Mail übermittelt" at 51.5,-43.49 h1.7
  text "19003073945" at 30.65,-43.85 h1.7
  text "[    ] Phenolpapier FR2" at -65.5,-45.49 h1.7
  text "[    ] 1.0mm" at -40.25,-45.49 h1.7
  text "[    ] OSP Entek Plus Cu 106A" at -26.75,-45.49 h1.7
  text "Nutzen nach Zeichnung                             Blatt 2/2" at 8.5,-45.49 h1.7
  text "[ x ] Gerberformat RS-274-X" at 51.5,-45.49 h1.7
  text "Technische Lieferbedingungen für gedruckte" at 78.5,-45.99 h1.7
  text "[ x ] 35uCu" at -65.5,-47.49 h1.7
  text "[    ] 1.2mm" at -40.25,-47.49 h1.7
  text "[    ] Partial tin plated / Partiell verzinnt" at -26.75,-47.49 h1.7
  text "[    ] . . . . . ." at 51.5,-47.49 h1.7
  text "Leiterplatten der EAO AG, P40531013" at 75.75,-47.99 h1.7
  text "[    ] 70uCu" at -65.5,-49.49 h1.7
  text "[ x ] 1.6mm" at -40.25,-49.49 h1.7
  text "[    ] . . . . ." at -26.75,-49.49 h1.7
  text "[    ] . . . . . ." at 51.5,-49.49 h1.7
  text "[ x ] Final dimension / Endmasse ø 37,7mm" at 8.5,-49.74 h1.7
  text "[    ] 105uCu" at -65.5,-51.49 h1.7
  text "[    ] 2.0mm" at -40.25,-51.49 h1.7
  text "[ x ] Solder mask / Lötstopplack" at -26.75,-51.49 h1.7
  text "[    ] . . . . . ." at 51.5,-51.49 h1.7
  text "[ x ] Milled boardedge / Randschnitt gefräst" at 8.5,-52.99 h1.7
  text "[ x ] Electrical tested / Elektrisch geprüft" at 75.75,-52.99 h1.7
  text "[    ] Single sided / Einseitig" at -65.5,-53.49 h1.7
  text "[    ] 2.4mm" at -40.25,-53.49 h1.7
  text "[    ] Component screen print white" at -26.75,-53.49 h1.7
  text "[    ] . . . . . ." at 51.5,-53.49 h1.7
  text "[ x ] Dimensions without allowance +/-0.2mm" at 8.5,-54.99 h1.7
  text "[ x ] Double sided / Doppelseitig" at -65.5,-55.74 h1.7
  text "[    ] . . . . ." at -40.25,-55.74 h1.7
  text "Bestückungsaufdruck weiss" at -22.25,-55.74 h1.7
  text "[    ] . . . . . ." at 51.5,-56.49 h1.7
  text "except drill holes" at 13.25,-56.99 h1.7
  text "Pb" at 93.849,-57.815 h2.5
  text "[    ] X-Layer PCB" at -65.5,-57.99 h1.7
  text "[    ] . . . . ." at -40.25,-57.99 h1.7
  text "[ x ] Plated through hole / Durchkontaktiert" at -26.75,-57.99 h1.7
  text "[ x ] Delivery as shown an drawing-no." at 51.55,-58.934 h1.7
  text "Nicht tolerierte Masse +/-0.2mm" at 13.25,-59.24 h1.7
  text "239142826" at 78.15,-60.35 h1.7
  text "ausser Bohrungen" at 13.25,-60.99 h1.7
  text "Anlieferung nach Zeichnung-Nr." at 51.55,-61.22 h1.7
  text "[ x ] Film - No. CS9142272 D" at 51.55,-63.76 h1.7
  text ".A14_ArtikelNr" at 87.25,-66.546 h2.15
  text ".A5_GeaendertAm" at -7.833,-69.147 h1.1
  text ".A8_AenderungsNr" at 94.527,-69.28 h1.1
  text ".A6_GeaendertVon" at -7.745,-71.95 h1.1
  text ".A2e_Description" at 8.25,-72.5 h2.35
  text ".A3_ErstelltAm" at -7.845,-74.639 h1.1
  text ".A2_Benennung" at 8.25,-74.75 h2.35
  text ".A17_Freigabestatus" at 59.5,-76 h1.5
  text ".A15_Seite" at 106.371,-76.095 h2.35
  text ".A16_vonSeite" at 109.685,-76.095 h2.35
  text ".A1_ZeichnungsNr" at 74,-76.296 h2.35
  text ".A7_Version" at 93,-76.296 h2.35
  text ".A12_ErsatzDurch" at -58.5,-77.046 h1.1
  text ".A13_ErsatzFuer" at -39,-77.046 h1.1
  text ".A11_Merkmale" at 13.5,-77.25 h1.1
  text ".A4_ErstelltVon" at -7.725,-77.321 h1.1
Schrift Top:
  lines w0.2: -11.85,-38.35 4.65,-38.35 ; 13.175,-33.025 35.675,-33.025 ; 42.15,-38.35 57.15,-38.35
  text "View from top side" at -17.85,-24.85 h4
  text "Montagehinweis" at 13.175,-32.025 h3.5
  text "Standartkabel" at -11.85,-37.85 h3
  text "Nexanskabel" at 42.15,-37.85 h3
  text "X1    gelb               +24VDC LED rot" at -11.825,-41.525 h3
  text "1 (ws)" at 42.175,-41.525 h3
  text "X2    grün               +24VDC LED grün" at -11.825,-45.525 h3
  text "2 (ws)" at 42.175,-45.525 h3
  text "X3    braun             +24VDC" at -11.825,-49.525 h3
  text "3 (ws)" at 42.175,-49.525 h3
  text "X4    weiss             0V" at -11.825,-53.525 h3
  text "4 (ws)" at 42.175,-53.525 h3
  text ".B14_ArtikelNr" at 87.25,-66.546 h2.15
  text ".B5_GeaendertAm" at -7.75,-69.25 h1.1
  text ".B8_AenderungsNr" at 94.527,-69.28 h1.5
  text ".B6_GeaendertVon" at -7.701,-72.052 h1.1
  text ".B2e_Description" at 8.25,-72.5 h2.35
  text ".B3_ErstelltAm" at -7.801,-74.741 h1.1
  text ".B2_Benennung" at 8.25,-74.75 h2.35
  text ".A17_Freigabestatus" at 59.5,-76 h1.5
  text ".B15_Seite" at 106.371,-76.095 h2.35
  text ".B16_vonSeite" at 109.685,-76.095 h2.35
  text ".B1_ZeichnungsNr" at 74.15,-76.3 h2.35
  text ".B7_Version" at 93,-76.296 h2.35
  text ".B12_ErsatzDurch" at -58.5,-77.25 h1.1
  text ".B13_ErsatzFuer" at -39,-77.25 h1.1
  text ".B11_Merkmale" at 13.5,-77.25 h1.1
  text ".B4_ErstelltVon" at -7.681,-77.397 h1.1
Rahmen Top:
  rectangle: -33.925,-72.791 -30.98,-69.846
  lines w0.1: -36,46 -36,49.534 ; -3.5,46 -3.5,49.534 ; 29,46 29,49.534 ; 61.5,46 61.5,49.534 ; 94,46 94,49.534
  lines w0.18: -71.325,-48.75 -67.765,-48.75 ; -71.325,-16.5 -67.765,-16.5 ; -71.325,16 -67.765,16 ; 112,-48.75 116.05,-48.75 ; 112,-16.5 116.05,-16.5 ; 112,16 116.05,16
  lines w0.21: -22.05,-75.565 -1.935,-75.571 ; -22.05,-70.295 -1.935,-70.296
  lines w0.36: -67.511,-74.595 -28.905,-74.595 ; -28.905,-78.25 -28.905,-67.396 ; -28.905,-72.83 -1.935,-72.83 ; -22.05,-78.25 -22.05,-67.396 ; -1.935,-78.25 -1.935,-67.646 ; -1.935,-75.546 58.285,-75.546 ; -1.935,-70.246 112,-70.246 ; 58.285,-78.25 58.285,-67.396 ; 72,-78.25 72,-70.246 ; 81.605,-70.246 81.605,-67.396 ; 90.7,-78.273 90.7,-70.269 ; 97.75,-78.298 97.75,-70.294 ; 104.785,-78.25 104.785,-70.246 ; 112,-67.396 -67.765,-67.396 -67.765,-78.25 ; -67.765,-78.25 112,-78.25 112,46 -67.765,46 -67.765,-78.25
  text "1" at -53.969,47.029 h1.3
  text "2" at -20.575,47.009 h1.3
  text "3" at 11.95,47.009 h1.3
  text "4" at 43.25,47.009 h1.3
  text "5" at 76.15,47.009 h1.3
  text "6" at 109.2,47.009 h1.3
  text "A" at 113.575,31.244 h1.3
  text "A" at -71.375,31.125 h1.3
  text "B" at -71.375,-0.9 h1.3
  text "B" at 113.575,-1.106 h1.3
  text "C" at -71.375,-32.575 h1.3
  text "C" at 113.575,-32.581 h1.3
  text "Artikel-Nr." at 75.895,-66.571 h2.15
  text "D" at 113.575,-68.656 h1.3
  text "D" at -71.275,-68.75 h1.3
  text "Scale" at -26.75,-68.796 h1.1
  text "Plot-date / Plotdatum" at 59.5,-69 h1.1
  text "'.Print_Date'" at 73.955,-69.071 h1.1
  text "Device / Type // Gerät / Typ" at -0.725,-69.196 h1.1
  text "Modified on: / Geändert am:" at -21,-69.25 h1.1
  text ".A9_GeraeteTyp" at 13.5,-69.25 h1.1
  text "AE-Nr." at 83.005,-69.296 h1.1
  text "Massstab" at -27.5,-69.796 h1.1
  text "EAO AG" at -65.925,-70.496 h1.1
  text ".A10_Massstab" at -27.25,-71.796 h1.8
  text "Description" at -0.75,-71.796 h1.1
  text "Approvel state" at 60.75,-71.796 h1.1
  text "Modified by / Geändert von:" at -21,-72 h1.1
  text "Item No. / Zeichnungs-Nr." at 73.955,-72.371 h1.1
  text "Version" at 92.165,-72.394 h1.1
  text "CH-4601 Olten" at -65.925,-72.496 h1.1
  text "Edition" at 99.515,-72.494 h1.1
  text "Sheet-No." at 106.345,-72.496 h1.1
  text "eao" at -43.995,-72.647 h5.78
  text "Benennung (PPS)" at -0.75,-73.046 h1.1
  text "Freigabestatus" at 60.75,-73.046 h1.1
  text "Format" at -27.05,-74.671 h1.1
  text "Draw on: / Erstellt am:" at -21,-74.75 h1.1
  text "Replaced with" at -66,-76.046 h1.1
  text "Replacement for" at -47,-76.046 h1.1
  text "/" at 108,-76.046 h2.35
  text "A4" at -26.7,-76.921 h1.8
  text "Draw by: / Erstellt von:" at -21,-77.25 h1.1
  text "Charakteristic / Merkmale" at -0.725,-77.296 h1.1
  text "Ersetzt durch" at -66,-77.546 h1.1
  text "Ersatz für" at -47,-77.546 h1.1
  text "© EAO AG" at -49,-79.75 h1.5
  text "Streng vertraulich. Alle Rechte ausdrücklich vorbehalten. Die Vervielfältigung und insbesondere die Verarbeitung in elektronischen Systemen ist ohne schriftliche Genehmigung der EAO AG nicht gestattet." at -41.25,-79.75 h1.5
  text "Strictly confidential. All rights stricly reserved. Reproduction and processing of data in electronical systems or in any form whatever is not permitted without written authority of EAO AG" at -41.25,-81.25 h1.5
Drill Drawing:
  lines w0.203: 53.264,8.199 104.199,8.199 ; 53.264,17.686 104.199,17.686 ; 61.85,5.037 61.85,20.849 ; 70.969,5.037 70.969,20.849 ; 87.136,5.037 87.136,20.849 ; 93.72,5.037 93.72,20.849 ; 53.264,5.037 104.199,5.037 104.199,20.849 53.264,20.849 53.264,5.037
  lines w0.254: 54.538,9.148 55.241,9.499 55.944,9.148 55.592,9.851 55.944,10.554 55.241,10.202 54.538,10.554 54.89,9.851 54.538,9.148 ; 54.538,13.716 55.944,13.716 55.241,12.31 54.538,13.716 ; 54.538,15.473 55.944,15.473 55.944,16.878 54.538,16.878 54.538,15.473
  text "Symbol" at 55.162,18.635 h1.83
  text "Hit Count" at 62.798,18.635 h1.83
  text "Finished Hole Size" at 71.918,18.635 h1.83
  text "Plated" at 88.085,18.635 h1.83
  text "Hole Type" at 94.668,18.635 h1.83
  text "179" at 62.798,15.473 h1.52
  text "0.25mm" at 71.918,15.473 h1.52
  text "PTH" at 88.085,15.473 h1.52
  text "Round" at 94.668,15.473 h1.52
  text "2" at 62.798,12.31 h1.52
  text "1.40mm" at 71.918,12.31 h1.52
  text "NPTH" at 88.085,12.31 h1.52
  text "Slot" at 94.668,12.31 h1.52
  text "5" at 62.798,9.148 h1.52
  text "2.20mm" at 71.918,9.148 h1.52
  text "NPTH" at 88.085,9.148 h1.52
  text "Round" at 94.668,9.148 h1.52
  text "186 Total" at 62.798,5.986 h1.52
  text "Slot definitions :" at 55.162,3.772 h1.52
  text "Routed Path Length" at 66.608,3.772 h1.52
  text "= Calculated from tool start centre position to tool end centre position." at 80.32,3.772 h1.52
  text "Hole Length" at 66.608,2.507 h1.52
  text "= Routed Path Length + Tool Size = Slot length as defined in the PCB layout" at 75.244,2.507 h1.52
Konstruktion:
  circle w0.01: c0,0 r15
  circle w0.01: c0,0.004 r17.5
  lines w0.2: -29.3,-1.5 -28.2,-2.5 -27.1,-3.5 ; -29.3,0.7 -28.2,-0.3 -27.1,-1.3 ; -29.3,2.9 -28.2,1.9 -27.1,0.9 ; -29.3,5.1 -28.2,4.1 -27.1,3.1 ; -29.3,7.3 -28.2,6.3 -27.1,5.3 ; -29.3,9.5 -28.2,8.5 -27.1,7.5 ; -8.8,-3 -7.7,-2 -6.6,-1 ; -8.8,-0.8 -7.7,0.2 -6.6,1.2 ; -8.8,1.4 -7.7,2.4 -6.6,3.4 ; -8.8,3.6 -7.7,4.6 -6.6,5.6 ; -8.8,5.8 -7.7,6.8 -6.6,7.8 ; -8.8,8 -7.7,9 -6.6,10 ; 5.8,9.6 6.9,10.6 8,11.6 ; 6,-2.1 7.1,-1.1 8.2,-0.1 ; 6,0.1 7.1,1.1 8.2,2.1 ; 6,2.3 7.1,3.3 8.2,4.3 ; 6,4.5 7.1,5.5 8.2,6.5 ; 6,6.7 7.1,7.7 8.2,8.7 ; 7.1,-3.3 8.2,-2.3 ; 25.9,-0.9 27,-1.9 28.1,-2.9 ; 25.9,1.3 27,0.3 28.1,-0.7 ; 25.9,3.5 27,2.5 28.1,1.5 ; 25.9,5.7 27,4.7 28.1,3.7 ; 25.9,7.9 27,6.9 28.1,5.9 ; 25.9,10.1 27,9.1 28.1,8.1
Sperrfläche Bottom:
  circle w0.1: c-10.605,-10.605 r2.1
  circle w0.1: c10.605,10.605 r2.1
  circle w0.1: c-10.605,10.605 r2.1
  circle w0.1: c10.605,-10.605 r2.1
  circle w0.6: c0,0 r18.55
  region: 17.4,-7.175 -2.5,-7.175 -2.5,-18.675 0.925,-18.625 6.7,-17.35 11.6,-14.45 16.125,-9.675
Fräsen:
  lines w0.1: -5.219,-20.186 ccw(c-4.968,-19.218) -4.718,-18.25 cw(c0,0) -4.718,18.25 ccw(c-4.968,19.218) -5.219,20.186 ccw(c0,0) -5.219,-20.186 ; 4.718,-18.25 ccw(c0,0) 4.718,18.25 cw(c4.968,19.218) 5.219,20.186 cw(c0,0) 5.219,-20.186 cw(c4.968,-19.218) 4.718,-18.25
V Cut:
  lines w0.1: -18.85,-18.25 18.85,-18.25 ; -18.85,18.25 18.85,18.25

## Text inside footprints (layer, text, board x,y; h text height)
NK: Route Tool Path "N" at 0.2,17.6 h0.8 r180; Route Tool Path "K" at 0.537,17.6 h0.8 r180